# Altium PCB RP2040_Dev_Board.PcbDoc
Units mm, origin at the board's own origin, x right, y up, seen from the top; angles counter-clockwise.
Board outline 25 x 55 mm, 4 copper layers (Top Layer, GND, PWR, Bottom Layer), stack 1.59 mm thick; 41 components, 56 nets, 209 pads, 72 vias.
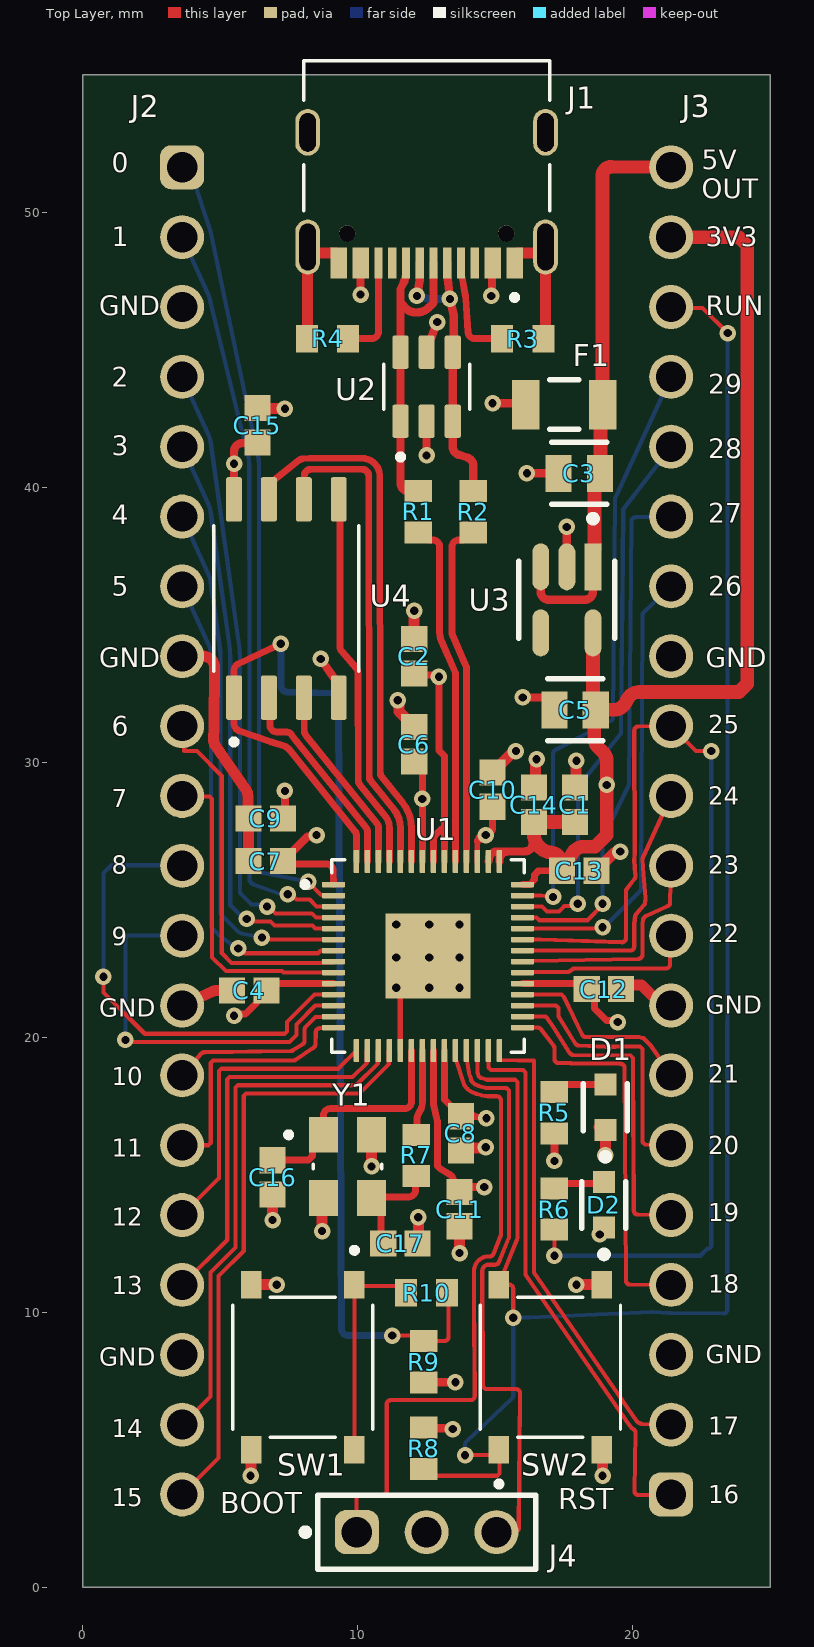
[diagram p0: Top Layer view]
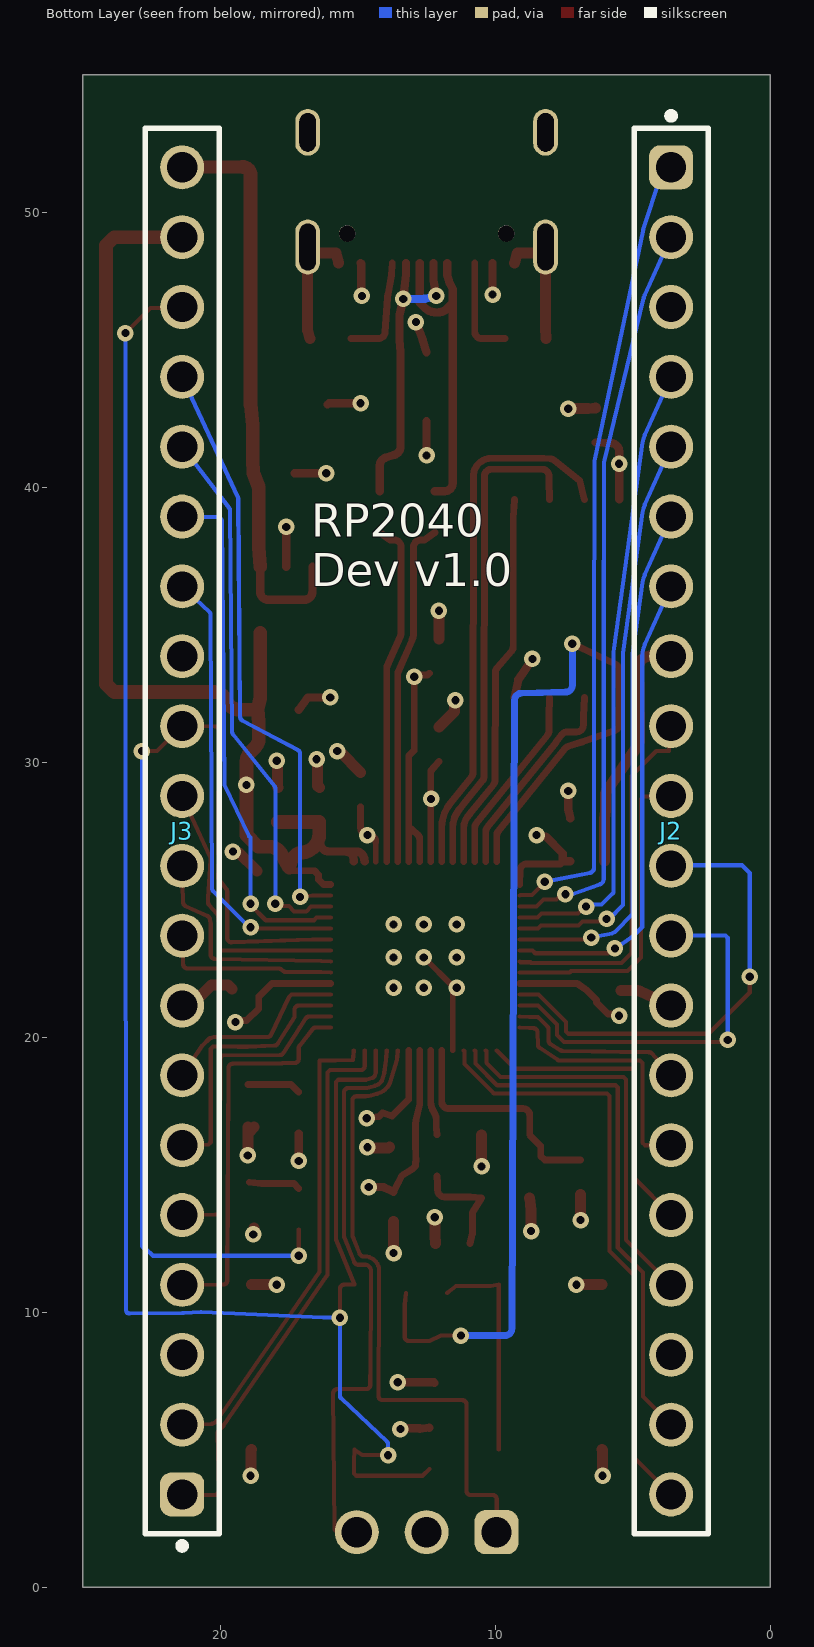
[diagram p1: Bottom Layer view, seen from below]
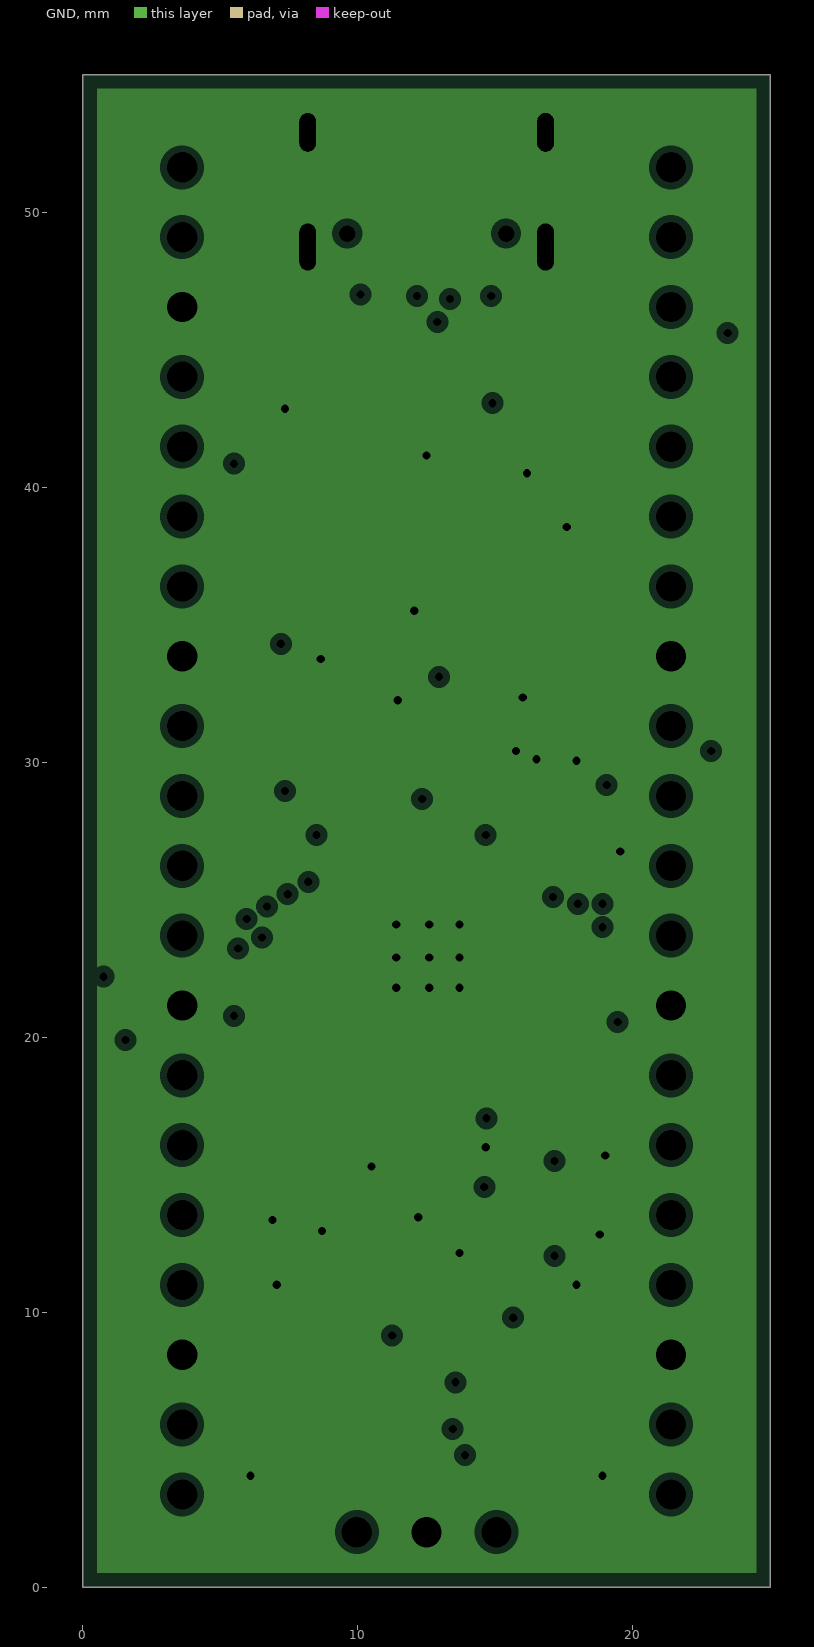
[diagram p2: GND, clearances drawn from the general rule]
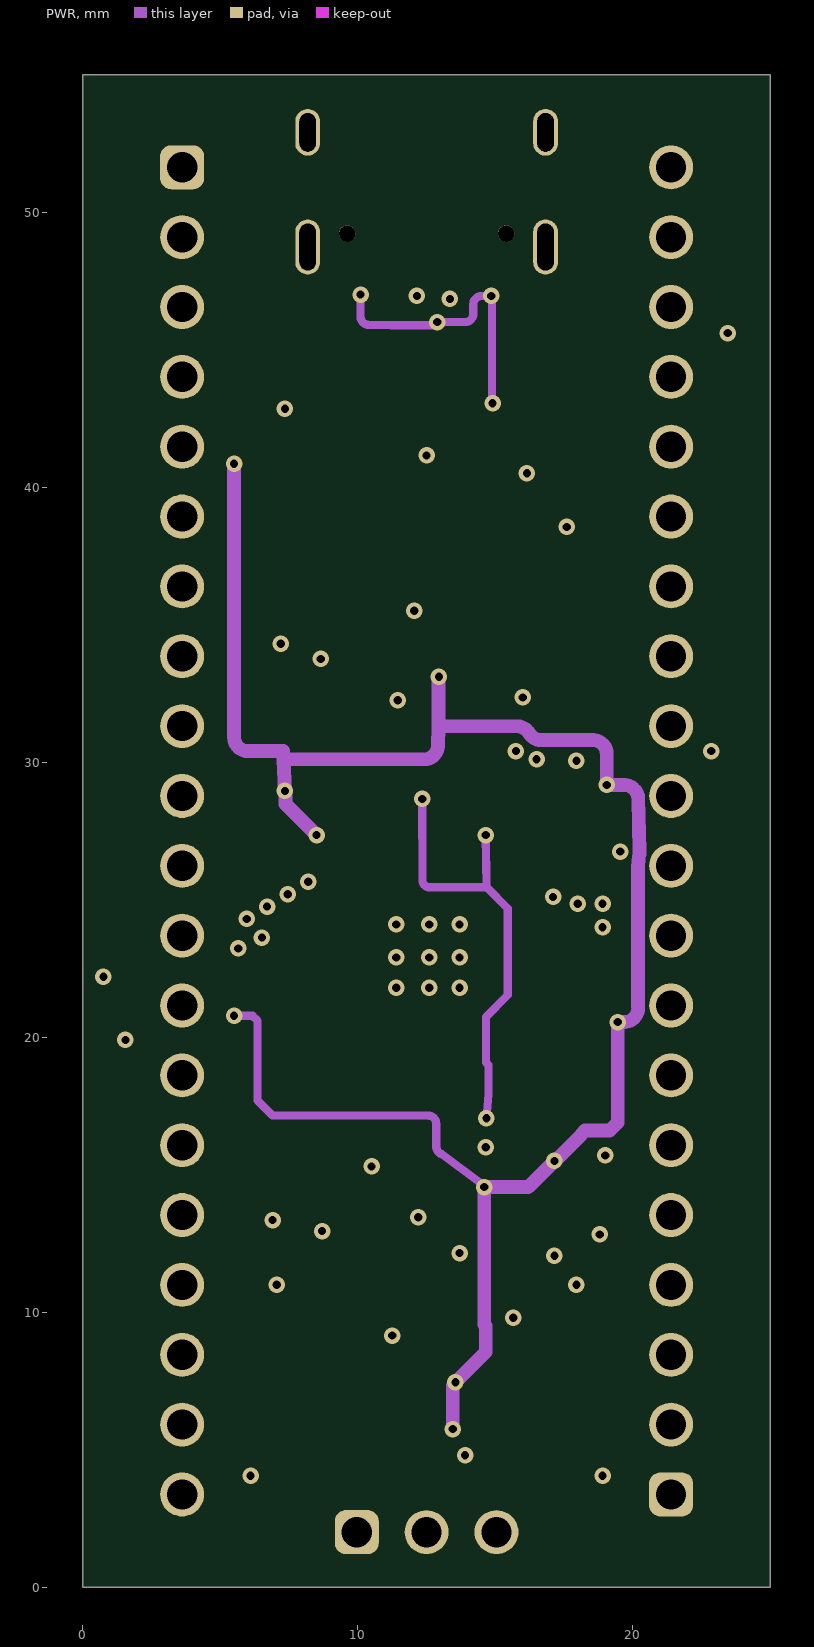
[diagram p3: PWR]
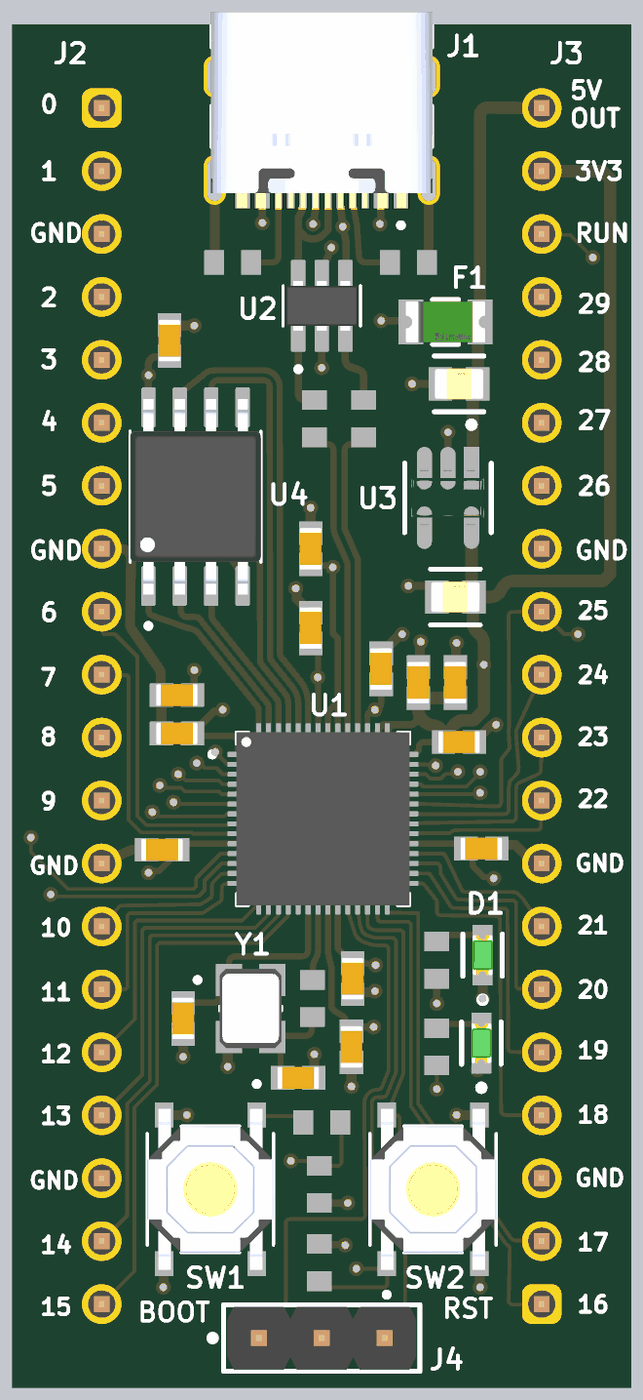
[diagram p4: 3D render of the assembled board from above, using the file's embedded part models]

## Layer stack, top to bottom
Top Solder: solder mask 0.0102, Solder Resist, Dk 3.5
Top Layer: signal copper 0.035
Dielectric 2: prepreg 0.21, PP-006, Dk 4.1
GND: plane copper 0.0175, net GND
Dielectric 1: dielectric 1.065, FR-4, Dk 4.8
PWR: signal copper 0.0175
Dielectric 3: prepreg 0.21, PP-006, Dk 4.1
Bottom Layer: signal copper 0.035
Bottom Solder: solder mask 0.0102, Solder Resist, Dk 3.5

## Board outline
0,0 25,0 25,55 0,55

## Design rules (kind name [scope] priority, off if disabled: settings)
BoardOutlineClearance [OnCopper] p1: gap=0.3 ignorepadtopadclearanceinfootprint=FALSE
Clearance [All] p1: gap=0.15 ignorepadtopadclearanceinfootprint=FALSE
DiffPairsRouting [All] p1: maxlimit=0.3 minlimit=0.15 mostfreqgap=0.2 toplayer_minwidth=0.2 toplayer_maxwidth=0.4 toplayer_prefwidth=0.3 midlayer1_minwidth=0.2 midlayer1_maxwidth=0.4 midlayer1_prefwidth=0.3 bottomlayer_minwidth=0.2 bottomlayer_maxwidth=0.4 bottomlayer_prefwidth=0.3 maxuncoupledlength=12.7
HoleSize [All] p1: absolutevalues=TRUE maxlimit=6.3 minlimit=0.3 maxpercent=80.000 minpercent=20.000
MinimumSolderMaskSliver U1_Sliver [InComponent('U1')] p1: minsoldermaskwidth=0
MinimumSolderMaskSliver [All] p2: minsoldermaskwidth=0.1
PlaneClearance [All] p1: clearance=0.25
PlaneConnect Via_Direct [IsVia] p1: planeconnectstyle=Direct reliefexpansion=0.508 reliefentries=4 reliefconductorwidth=0.254 reliefairgap=0.254
PlaneConnect [All] p2: planeconnectstyle=Relief reliefexpansion=0.508 reliefentries=4 reliefconductorwidth=0.254 reliefairgap=0.254
PolygonConnect U1_Direct [InComponent('U1')] p1: thpad.connectstyle=Direct thpad.reliefconductorwidth=0.254 thpad.reliefentries=4 thpad.polygonreliefangle="90 Angle" thpad.airgapwidth=0.254 smdpad.connectstyle=Direct smdpad.reliefconductorwidth=0.254 smdpad.reliefentries=4 smdpad.polygonreliefangle="90 Angle" smdpad.airgapwidth=0.254 via.connectstyle=Relief via.reliefconductorwidth=0.254 via.reliefentries=4 via.polygonreliefangle="90 Angle" via.airgapwidth=0.254
PolygonConnect [All] p2: connectstyle=Relief reliefconductorwidth=0.25 reliefentries=4 polygonreliefangle="90 Angle" airgapwidth=0.25
RoutingVias [All] p1: holewidth=0.3 width=0.6 viastyle="Through Hole" minholewidth=0.3 minwidth=0.6 maxholewidth=0.3 maxwidth=0.6
SolderMaskExpansion Tented [IsVia] p1: expansion=0 istentingtop=TRUE
SolderMaskExpansion [All] p2: expansion=0 istentingtop=FALSE
SupplyNets "Schematic Supply Nets_4" [InNet('3V3')] p1: voltage=0.000
SupplyNets "Schematic Supply Nets_3" [InNet('VBUS')] p2: voltage=0.000
SupplyNets "Schematic Supply Nets_2" [InNet('GND')] p3: voltage=0.000
SupplyNets "Schematic Supply Nets_1" [InNet('5V')] p4: voltage=0.000
SupplyNets "Schematic Supply Nets" [InNet('1V1')] p5: voltage=0.000
Width Power [InNet('VBUS') Or InNet('5V') Or InNet('3V3')] p1: maxlimit=1.5 minlimit=0.2 preferedwidth=0.5
Width [All] p2: maxlimit=1 minlimit=0.15 preferedwidth=0.25
25 further rules are at their usual default settings.

## Classes and differential pairs
differential pair USB_D: +USB_D_P -USB_D_N
differential pair USB_CONN: +USB_CONN_P -USB_CONN_N

## Components (designator, comment, footprint, x,y, rotation, side; value= is the part's Value field where it differs from the comment)
C1 "100nF" CAPC1608X90X40NL10T20 17.9,28.45 r90 top
C2 "100nF" CAPC1608X90X40NL10T20 12.05,33.85 r90 top
C3 "10uF" FP-C0805C106K4PACTU-MFG 18.05,40.5 r0 top
C4 "100nF" CAPC1608X90X40NL10T20 6.05,21.7 r180 top
C5 "10uF" FP-C0805C106K4PACTU-MFG 17.9,31.9 r0 top
C6 "100nF" CAPC1608X90X40NL10T20 12.05,30.65 r90 top
C7 "100nF" CAPC1608X90X40NL10T20 6.65,26.4 r180 top
C8 "100nF" CAPC1608X90X40NL10T20 13.75,16.5 r270 top
C9 "100nF" CAPC1608X90X40NL10T20 6.65,27.95 r180 top
C10 "1uF" CAPC1608X90X40NL10T20 14.9,29 r90 top
C11 "100nF" CAPC1608X90X40NL10T20 13.7,13.75 r270 top
C12 "100nF" CAPC1608X90X40NL10T20 18.95,21.75 r0 top
C13 "100nF" CAPC1608X90X40NL10T20 18.05,26.05 r0 top
C14 "1uF" CAPC1608X90X40NL10T20 16.4,28.45 r90 top
C15 "100nF" CAPC1608X90X40NL10T20 6.35,42.25 r270 top
C16 "15pF" CAPC1608X90X40NL10T20 6.9,14.9 r90 top
C17 "15pF" CAPC1608X90X40NL10T20 11.55,12.5 r180 top
D1 "KT-0603R" FP-SML-D12-MFG 19,17.45 r90 top
D2 "KT-0603R" FP-SML-D12-MFG 18.95,13.9 r90 top
F1 "1206L050YR" FP-1206L050YR-MFG 17.5,43 r0 top
J1 "TYPE-C-31-M-12" HRO_TYPE-C-31-M-12 12.5,52.9 r180 top locked
J2 "2.54-1*20P" 61302011121 3.61,27.5 r270 bottom locked
J3 "2.54-1*20P" 61302011121 21.39,27.5 r90 bottom locked
J4 "2.54-1*3P" 61300311121 12.5,2 r0 top
R1 "22R" RESC1608X55X25ML10T15 12.2,39.1 r270 top
R2 "22R" RESC1608X55X25ML10T15 14.2,39.1 r270 top
R3 "5.1k" RESC1608X55X25ML10T15 15.999,45.4 r0 top
R4 "5.1k" RESC1608X55X25ML10T15 8.9,45.4 r0 top
R5 "1k" RESC1608X55X25ML10T15 17.15,17.25 r90 top
R6 "1k" RESC1608X55X25ML10T15 17.15,13.75 r90 top
R7 "1k" RESC1608X55X25ML10T15 12.125,15.7 r90 top
R8 "10k" RESC1608X55X25ML10T15 12.4,5.05 r90 top
R9 "10k" RESC1608X55X25ML10T15 12.4,8.2 r90 top
R10 "1k" RESC1608X55X25ML10T15 12.5,10.7 r180 top
SW1 "TS-1187A-B-A-B" SW_TS-1187A-B-A-B 8,8 r270 top
SW2 "TS-1187A-B-A-B" SW_TS-1187A-B-A-B 17,8 r90 top
U1 "RP2040" QFN40P700X700X90-57N 12.55,22.95 r0 top
U2 "USBLC6-2SC6" SOT95P280X145-6N 12.5,43.65 r90 top
U3 "AP2112K-3.3TRG1" FP-SOT25-IPC_A 17.6,35.9 r270 top
U4 "W25Q128JVSIQ" SOIC127P790X216-8N 7.4,35.95 r90 top
Y1 "ABM8-272-T3" XTAL_ABM8-272-T3 9.625,15.3 r0 top

## Footprints (in the part's own frame and the unit in brackets; to place one, negate y for a bottom-side part, rotate by r counter-clockwise, add the part's x,y. Pads: shape width x height; smd on the part's side, far side on the other; paste and mask are expansions set on the pad)
61300311121 [mm] "Pin Header, pitch 2.54 mm, THT, Vertical, single row, 3p"
  rrect50% 1.6x1.6 hole 1.1: 1(-2.54,0)
  round 1.6 hole 1.1: 2(0,0) 3(2.54,0)
  silkscreen extent -4.53,-1.35 3.96,1.35, body extent -3.81,-1.27 3.81,1.27, height 8.57
61302011121 [mm] "Pin Header, pitch 2.54 mm, THT, Vertical, single row, 20p"
  rrect50% 1.6x1.6 hole 1.1: 1(-24.13,0)
  round 1.6 hole 1.1: 2(-21.59,0) 3(-19.05,0) 4(-16.51,0) 5(-13.97,0) 6(-11.43,0) 7(-8.89,0) 8(-6.35,0) 9(-3.81,0) 10(-1.27,0) 11(1.27,0) 12(3.81,0) 13(6.35,0) 14(8.89,0) 15(11.43,0) 16(13.97,0) 17(16.51,0) 18(19.05,0) 19(21.59,0) 20(24.13,0)
  silkscreen extent -26.12,-1.35 25.55,1.35, body extent -25.4,-1.27 25.4,1.27, height 8.57
CAPC1608X90X40NL10T20 [mm] "Chip Capacitor, 2-Leads, Body 1.70x0.90mm, IPC Medium Density"
  rect 0.95x0.95 smd: 1(-0.625,0) 2(0.625,0)
  body extent -0.85,-0.45 0.85,0.45, height 0.9
FP-1206L050YR-MFG [mm]
  rect 1x1.8 smd paste+0 mask+0: 1(-1.4,0) 2(1.4,0)
  silkscreen extent -0.53,-0.9 0.53,0.9, body extent -2,-1 2,1, height 0.25
FP-C0805C106K4PACTU-MFG [mm]
  rect 0.95x1.35 smd paste+0 mask+0: 1(-0.75,0) 2(0.75,0)
  silkscreen extent -1,-1.12 1,1.12, body extent -1.4,-0.85 1.4,0.85, height 0.25
FP-SML-D12-MFG [mm]
  rect 0.8x0.8 smd paste+0 mask+0: 1(-0.825,0) 2(0.825,0)
  silkscreen extent -1.92,-0.8 0.85,0.8, body extent -1.33,-0.55 1.33,0.55, height 0.25
FP-SOT25-IPC_A [mm]
  rect 1.707x0.616 smd paste+0 mask+0: 1(-1.201,0.95)
  rrect100% 1.707x0.616 smd paste+0 mask+0: 2(-1.201,0) 3(-1.201,-0.95) 4(1.201,-0.95) 5(1.201,0.95)
  silkscreen extent -3.08,-1.75 1.4,1.75, body extent -2.55,-2 2.55,2, height 0.25
HRO_TYPE-C-31-M-12 [mm]
  rect 0.6x1.14 smd mask+0.05: A1_B12(-3.2,4.75) A4_B9(-2.4,4.75) B1_A12(3.2,4.75) B4_A9(2.4,4.75)
  rect 0.3x1.14 smd mask+0.05: A5(-1.25,4.75) A6(-0.25,4.75) A7(0.25,4.75) A8(1.25,4.75) B5(1.75,4.75) B6(0.75,4.75) B7(-0.75,4.75) B8(-1.75,4.75)
  oval 0.9x2 hole 0.6 slot 1.7 at 90 deg: S1(-4.325,4.17) S2(4.325,4.17)
  oval 0.9x1.7 hole 0.6 slot 1.4 at 90 deg: S3(-4.325,0) S4(4.325,0)
  round 0.6 hole 0.6 unplated: ""(-2.89,3.68) ""(2.89,3.68)
  silkscreen extent -4.47,-2.6 4.47,6.1, body extent -4.47,-2.6 4.47,5.31, height 3.31
QFN40P700X700X90-57N [mm]
  rrect25% 0.84x0.2 smd: 1(-3.435,2.6) 2(-3.435,2.2) 3(-3.435,1.8) 4(-3.435,1.4) 5(-3.435,1) 6(-3.435,0.6) 7(-3.435,0.2) 8(-3.435,-0.2) 9(-3.435,-0.6) 10(-3.435,-1) 11(-3.435,-1.4) 12(-3.435,-1.8) 13(-3.435,-2.2) 14(-3.435,-2.6) 29(3.435,-2.6) 30(3.435,-2.2) 31(3.435,-1.8) 32(3.435,-1.4) 33(3.435,-1) 34(3.435,-0.6) 35(3.435,-0.2) 36(3.435,0.2) 37(3.435,0.6) 38(3.435,1) 39(3.435,1.4) 40(3.435,1.8) 41(3.435,2.2) 42(3.435,2.6)
  rrect25% 0.2x0.84 smd: 15(-2.6,-3.435) 16(-2.2,-3.435) 17(-1.8,-3.435) 18(-1.4,-3.435) 19(-1,-3.435) 20(-0.6,-3.435) 21(-0.2,-3.435) 22(0.2,-3.435) 23(0.6,-3.435) 24(1,-3.435) 25(1.4,-3.435) 26(1.8,-3.435) 27(2.2,-3.435) 28(2.6,-3.435) 43(2.6,3.435) 44(2.2,3.435) 45(1.8,3.435) 46(1.4,3.435) 47(1,3.435) 48(0.6,3.435) 49(0.2,3.435) 50(-0.2,3.435) 51(-0.6,3.435) 52(-1,3.435) 53(-1.4,3.435) 54(-1.8,3.435) 55(-2.2,3.435) 56(-2.6,3.435)
  rect 3.1x3.1 smd paste-0.57: 57(0,0)
  silkscreen extent -4.57,-3.5 3.5,3.5, body extent -3.5,-3.5 3.5,3.5, height 0.9
RESC1608X55X25ML10T15 [mm] "Chip Resistor, 2-Leads, Body 1.60x0.80mm, IPC Low Density"
  rect 0.8x1 smd: 1(-0.75,0) 2(0.75,0)
  body extent -0.85,-0.45 0.85,0.45, height 0.55
SOIC127P790X216-8N [mm]
  rrect25% 1.61x0.58 smd: 1(-3.605,1.905) 2(-3.605,0.635) 3(-3.605,-0.635) 4(-3.605,-1.905) 5(3.605,-1.905) 6(3.605,-0.635) 7(3.605,0.635) 8(3.605,1.905)
  silkscreen extent -5.31,-2.64 2.64,2.64, body extent -3.95,-2.64 3.95,2.64, height 2.16
SOT95P280X145-6N [mm]
  rrect25% 1.21x0.59 smd: 1(-1.255,0.95) 2(-1.255,0) 3(-1.255,-0.95) 4(1.255,-0.95) 5(1.255,0) 6(1.255,0.95)
  silkscreen extent -2.65,-1.57 0.81,1.57, body extent -1.4,-1.46 1.4,1.46, height 0.4
SW_TS-1187A-B-A-B [mm]
  rect 1x0.75 smd: A(-3,1.875) B(3,1.875) C(-3,-1.875) D(3,-1.875)
  silkscreen extent -4.35,-2.55 2.55,2.55, body extent -3.25,-2.55 3.25,2.55, height 1.55
XTAL_ABM8-272-T3 [mm]
  rect 1.05x1.3 smd: 1(-0.875,1.15) 2(-0.875,-1.15) 3(0.875,-1.15) 4(0.875,1.15)
  silkscreen extent -2.24,-0.09 1.25,1.25, body extent -1.25,-1.6 1.25,1.6, height 0.7

## Part data
C1 C2 C4 C6 C7 C8 C9 C11 C12 C13 C15: library part CMP-001-00017-6, "Chip Capacitor, 100 nF, +/- 10%, 50 V, 0603 (1608 Metric)", Capacitor Type=Ceramic, Case/Package=0603, LCSC=C14663, Max Operating Temperature=125°C, Min Operating Temperature=-55°C, Tolerance=10%, Voltage Rating=50V, Mounting Technology=SM, Pins=2, RoHS Compliant=True
C3 C5: library part CMP-03020-034671-1, "CAP CER 10UF 16V X5R 0805", Case Code (Imperial)=0805, Case Code (Metric)=2012, Dielectric=X5R, Dielectric Material=Ceramic, LCSC=C15850, Max Operating Temperature=85°C, Min Operating Temperature=-55°C, Package Quantity=1, Tolerance=10%, Voltage=16V, Capacitance=10uF, Case/Package=0805, Construction=Flat, Contact Plating=Tin, Depth=1.25mm, Dissipation Factor=5%, Height=1.25mm, Lead Free="Lead Free", Length=2mm, Mount="Surface Mount", Number of Pins=2, Packaging="Tape and Reel", Radiation Hardening=No, REACH SVHC="No SVHC", Series=C, Termination=SMD/SMT, Thickness=0.055inch, Voltage Rating=16V, Voltage Rating (DC)=16V, Width=0.049inch
C10 C14: library part CMP-001-00017-6, "1uF 50V X5R ±10% 0603 Multilayer Ceramic Capacitors MLCC - SMD/SMT ROHS", Capacitor Type=Ceramic, Case/Package=0603, LCSC=C15849, Max Operating Temperature=125°C, Min Operating Temperature=-55°C, Tolerance=10%, Voltage Rating=50V, Mounting Technology=SM, Pins=2, RoHS Compliant=True
C16 C17: library part CMP-001-00017-6, "CAP CER 15pF 50V C0G 0603", Capacitor Type=Ceramic, Case/Package=0603, LCSC=C1644, Max Operating Temperature=125°C, Min Operating Temperature=-55°C, Tolerance=10%, Voltage Rating=50V, Mounting Technology=SM, Pins=2, RoHS Compliant=True
D1 D2: library part CMP-08952-000014-1, "LED RED 1608 SMD", Colour=Red, Forward Current=20mA, Forward Voltage=2.2V, LCSC=C2286, Manufacturer=Rohm, Manufacturer Part Number=SML-D12U8WT86C, Package=SML-D12, Power Dissipation=54mW, Reverse Voltage=5V, Temperature="-40°C to +85°C", Temperature Range High=+85°C, Temperature Range Low=-40°C, Automotive=Yes, Automotive Grade="Grade 3", Category=Diode, ComponentLink2Description=Datasheet, ComponentLink2URL=https://fscdn.rohm.com/en/products/databook/datasheet/opto/led/chip_mono/sml-d12x8(c)-e.pdf, Device Class L1=Optoelectronics, Device Class L2=LEDs, Device Class L3=unset, Digikey Description="LED RED 1608 SMD", Height=0.65mm, Lead Free=Yes, Led Orientation="Top View", Luminous Intensity=63mcd, Mouser Description="LED Uni-Color Red Automotive 2-Pin Chip 0603(1608Metric) T/R", Octopart=https://octopart.com/sml-d12u8wt86c-rohm-77740214, RoHS=TRUE, Wavelength=620nm
F1: library part CMP-08606-000073-1, "PTC RESET FUSE 6V 500MA 1206", Case Code (Imperial)=1206, Case Code (Metric)=3216, Current Rating=100A, Hold Current=500mA, LCSC=C163512, Max Operating Temperature=85°C, Max Power Dissipation=600mW, Max Voltage Rating (DC)=6V, Min Operating Temperature=-40°C, Package Quantity=4000, Resistance=700mR, Trip Current=1A, Approvals=cULus, Case/Package=1206, Height=0.75mm, Lead Free="Lead Free", Length=3.4mm, Max Current Rating=100A, Operating Supply Voltage=6V, Packaging="Tape and Reel", Power Dissipation=600mW, REACH SVHC="No SVHC", RoHS Compliant=Yes, Series=1206L, Terminal Material=Copper, Termination=SMD/SMT, Time to Trip=0.1s, Voltage Rating=6V, Voltage Rating (DC)=6V, Width=1.8mm, Working Voltage=6V
J1: library part CMP-009-000000-1, "USB Connectors 24 Receptacle 1 8.94*7.3mm RoHS", LCSC=C165948, Package=Package, Check_prices=https://www.snapeda.com/parts/TYPE-C-31-M-12/HRO+Electronics+Co.%252C+Ltd./view-part/?ref=eda, Component Type=Standard, Design Item ID=TYPE-C-31-M-12, MF="HRO Electronics Co., Ltd.", MP=TYPE-C-31-M-12, Pin Count=16, SnapEDA_Link=https://www.snapeda.com/parts/TYPE-C-31-M-12/HRO+Electronics+Co.%252C+Ltd./view-part/?ref=snap, Source=TYPE-C-31-M-12.SchLib
J2 J3: library part CMP-1502-01102-4, "THT Vertical Pin Header WR-PHD, Pitch 2.54 mm, Single Row, 20 pins", Color=Black, Contact Resistance=20mΩ, Current Rating=3A, LCSC=C50981, Operating Supply Voltage=250V, Connector Type="Male Pin", Contact Material=Copper, Contact Mating Length=5.9944mm, Contact Plating=Gold, Gender=Male, Lead Pitch=2.54mm, Mount="Through Hole", Number of Contacts=20, Number of Pins=20, Number of Positions=20, Number of Rows=1, Orientation=Vertical, Packaging=Bulk, Pitch=2.54mm, RoHS=Compliant, Termination=Solder
J4: library part CMP-1502-01062-4, "THT Vertical Pin Header WR-PHD, Pitch 2.54 mm, Single Row, 3 pins", Color=Black, Contact Resistance=20mΩ, Current Rating=3A, LCSC=C49257, Max Operating Temperature=105°C, Min Operating Temperature=-40°C, Operating Supply Voltage=250V, Connector Type="Male Pin", Contact Material=Gold, Contact Mating Length=5.9944mm, Contact Plating=Gold, Gender=Male, Height=8.94mm, Lead Free="Lead Free", Lead Pitch=2.54mm, Mount="Through Hole", Number of Contacts=3, Number of Pins=3, Number of Positions=3, Number of Rows=1, Orientation=Vertical, Packaging=Bulk, Pitch=2.54mm, RoHS=Compliant, Termination=Solder, Voltage Rating=250V
R1 R2: library part CMP-2000-04177-1, LCSC=C23345, Manufacturer=Yageo, Part Number=RC0603FR-1020KL
R3 R4: library part CMP-2000-04177-1, LCSC=C23186, Manufacturer=Yageo, Part Number=RC0603FR-1020KL
R5 R6 R7 R10: library part CMP-2000-04177-1, LCSC=C21190, Manufacturer=Yageo, Part Number=RC0603FR-1020KL
R8 R9: library part CMP-2000-04177-1, LCSC=C25804, Manufacturer=Yageo, Part Number=RC0603FR-1020KL
SW1 SW2: library part CMP-011-000000-3, "SPST 50mA @ 12VDC Top Actuated Round Button 160gf SMD Tactile Switches RoHS", LCSC=C318884, Package=None, Availability=Unavailable, Component Type=Standard, Design Item ID=TS-1187A-B-A-B, MP=TS-1187A-B-A-B, Pin Count=4, Price=None, Source=TS-1187A-B-A-B.SchLib
U1: library part CMP-003-000000-1, "RP2040 chip for Raspberry Pi Pico - ARM® Cortex®-M0+ MCU 32-Bit", LCSC=C2040, Package=None, Check_prices=https://www.snapeda.com/parts/RP2040/Raspberry+Pi/view-part/?ref=eda, Component Type=Standard, Design Item ID=RP2040, MF="Raspberry Pi", MP=RP2040, Pin Count=57, SnapEDA_Link=https://www.snapeda.com/parts/RP2040/Raspberry+Pi/view-part/?ref=snap, Source=RP2040.SchLib
U2: library part CMP-004-00031-1, "17V Clamp 5A (8/20Âµs) Ipp Tvs Diode Surface Mount SOT-23-6", Case/Package="SOT-23-6 STMicroelectronics", LCSC=C7519, Availability="In Stock", Check_prices=https://www.snapeda.com/parts/USBLC6-2SC6/STMicroelectronics/view-part/?ref=eda, Component Type=Standard, Design Item ID=USBLC6-2SC6, MF=STMicroelectronics, MP=USBLC6-2SC6, Pins=6, Price=None, Purchase-URL=https://pricing.snapeda.com/search/part/USBLC6-2SC6/?ref=eda, SnapEDA_Link=https://www.snapeda.com/parts/USBLC6-2SC6/STMicroelectronics/view-part/?ref=snap, Source=USBLC6-2SC6.SchLib
U3: library part CMP-12756-000035-1, "IC REG LINEAR 3.3V 600MA SOT25", Case/Package=SOT-23-5, Dropout Voltage=250mV, LCSC=C51118, Max Input Voltage=6V, Max Operating Temperature=85°C, Max Output Current=600mA, Min Input Voltage=2.5V, Min Operating Temperature=-40°C, Output Voltage=3.3V, Package Quantity=1, Quiescent Current=55uA, Accuracy=1.5%, Height=1.3mm, Lead Free="Lead Free", Length=3.1mm, Mount="Surface Mount", Number of Outputs=1, Number of Pins=5, Number of Regulators=1, Output Current=600mA, Output Type=Fixed, Packaging="Tape and Reel", Polarity=Positive, Width=1.7mm
U4: library part CMP-031-00006-1, "FLASH - NOR Memory IC 128Mb (16M x 8) SPI - Quad I/O, QPI, DTR 133 MHz 8-SOIC", Case/Package="SOIC-8 Winbond Electronics", LCSC=C97521, Check_prices=https://www.snapeda.com/parts/W25Q128JVSIQ/Winbond/view-part/?ref=eda, Component Type=Standard, Design Item ID=W25Q128JVSIQ, MF="Winbond Electronics", MP=W25Q128JVSIQ, Pins=8, SnapEDA_Link=https://www.snapeda.com/parts/W25Q128JVSIQ/Winbond/view-part/?ref=snap, Source=W25Q128JVSIQ.SchLib
Y1: library part CMP-003-00030-1, "12 MHz Â±30ppm Crystal 10pF 50 Ohms 4-SMD, No Lead", Case/Package="NON-STANDARD-4 Abracon", LCSC=C20625731, Check_prices=https://www.snapeda.com/parts/ABM8-272-T3/Abracon/view-part/?ref=eda, Component Type=Standard, Design Item ID=ABM8-272-T3, MF=ABRACON, MP=ABM8-272-T3, Pins=4, SnapEDA_Link=https://www.snapeda.com/parts/ABM8-272-T3/Abracon/view-part/?ref=snap, Source=ABM8-272-T3.SchLib

## Via types
v1: diameter 0.6, hole 0.3, Top Layer to Bottom Layer, tented both sides, 72 vias

## Nets (pads, with @x,y where several pads share a name; then routed paths per layer and width w, separated by ;. In a path a pad name is that pad's centre, name@x,y a point inside that pad or via, vN(x,y) a via of type N, cw(c..) or ccw(c..) an arc to the next point about the centre after c; other vN are vias at no path point)
1V1: C6.1 C8.1 C10.1 U1.23 U1.45 U1.50 | length 26.1
  Top Layer w0.2: U1.45 14.35,27.1
  Top Layer w0.25: C6.1 12.35,29.675 12.35,27.617 cw(c10.5,27.612) 12.35,27.612 U1.50 ; U1.23 13.15,17.725 C8.1 14.1,17.25 14.233,17.117 v1(14.675,17.05) ; 14.35,27.1 cw(c14.6,27.1) 14.6,27.35 v1(14.65,27.35) ccw(c14.65,27.6) 14.9,27.6 C10.1
  PWR w0.3: v1(12.339,28.662) 12.349,25.699 ; 12.349,25.698 ccw(c12.599,25.7) 12.599,25.45 14.68,25.45 ; v1(14.65,27.35) 14.68,25.45 ; v1(14.675,17.05) 14.749,17.925 ccw(c14.45,17.95) 14.75,17.95 14.75,18.986 14.655,19.081 14.655,20.736 15.45,21.531 15.45,24.68 14.68,25.45
3V3: C1.1 C2.1 C4.1 C5.2 C7.1 C9.1 C11.1 C12.1 C13.1 C14.1 C15.2 J3.19 R5.1 R8.2 R9.1 U1.1 U1.10 U1.22 U1.33 U1.42 U1.43 U1.44 U1.48 U1.49 U3.5 U4.8 | length 151.9
  Top Layer w0.25: v1(5.5,20.775) 5.567,20.842 5.906,20.842 6.325,21.261 6.325,21.35 C4.1 7.025,21.95 U1.10 ; C7.1@7.625,26.3 8.855,26.3 cw(c8.855,26.05) 9.105,26.055 U1.1 ; C2.1@12.4,33.232 12.465,33.167 12.883,33.167 v1(12.95,33.1) 12.95,30.428 13.15,30.228 13.15,27.65 ; U1.22 12.75,17.559 12.892,16.956 12.899,16.875 ; U1.49 12.75,27.187 cw(c13,27.187) 12.835,27.375 13.15,27.65 ; 12.899,16.874 cw(c12.625,16.85) 12.9,16.85 12.9,16.05 cw(c12.625,16.05) 12.9,16.045 12.894,15.726 12.891,15.533 ccw(c13.141,15.531) 12.891,15.531 12.891,15.473 12.9,15.464 12.9,15.314 13.013,15.201 13.365,14.994 13.416,14.943 13.525,14.725 C11.1 ; U1.48 13.15,27.65 ; U1.33 18.125,21.95 C12.1 18.603,21.472 18.603,21.047 19.048,20.602 19.398,20.602 v1(19.45,20.55) ; U1.42 16.255,25.55 16.429,25.724 16.429,25.904 16.575,26.05 C13.1
  Top Layer w0.3: U4.8 5.499,40.21 5.499,41.301 cw(c5.799,41.3) 5.799,41.6 6.025,41.6 C15.2 ; C7.1 7.55,26.4 7.55,26.675 8.168,27.293 8.443,27.293 v1(8.5,27.35) ; C9.1 7.35,28.275 v1(7.35,28.95) ; R9.1@12.21,7.425 12.235,7.45 v1(13.55,7.45) ; R8.2 12.75,5.75 12.75,5.775 13.425,5.775 v1(13.45,5.75) ; C11.1 14.025,14.525 14.079,14.55 v1(14.6,14.55) ; U1.44 14.766,26.465 ccw(c14.35,26.55) 14.771,26.492 cw(c15.068,26.45) 15.032,26.748 15.05,26.75 15.45,26.75 ; U1.43 15.15,26.45 cw(c15.45,26.45) 15.45,26.75 ; C14.1@16.364,27.5 16.364,27.05 cw(c16.064,27.05) 16.064,26.75 15.45,26.75 ; v1(17.15,15.5) R5.1
  Top Layer w0.5: C1.1 C14.1 16.4,27.4 ccw(c17.089,27.4) 17.015,26.715 cw(c16.96,26.218) 17.385,26.482 cw(c16.699,26.057) 17.498,26.172 17.799,26.679 cw(c18.229,26.424) 17.967,26.85 cw(c18.2,26.525) 18.2,26.925 18.626,26.925 19.05,27.349 v1(19.05,29.168) 19.05,30.025 ccw(c18.55,30.025) 18.883,30.398 ; U3.5 18.55,34.154 18.55,32.325 C5.2 ; 18.882,30.399 18.768,30.501 cw(c19.1,30.875) 18.6,30.875 18.6,31.475 C5.2 ; J3.19 21.394,49.086 23.862,49.086 24.155,48.793 24.155,32.843 23.862,32.55 20.235,32.55 ccw(c20.237,32.05) 19.769,32.226 cw(c19.3,32.4) 19.768,32.225 cw(c19.3,32.4) 19.3,31.9 18.875,31.9 C5.2
  PWR w0.3: v1(5.5,20.775) 6.174,20.775 6.35,20.599 6.35,17.7 6.9,17.15 12.55,17.15 cw(c12.55,16.85) 12.85,16.85 12.85,16.022 ccw(c13.15,16.022) 13.055,15.738 14.424,14.726 v1(14.6,14.55)
  PWR w0.5: v1(5.5,40.85) 5.5,30.9 ccw(c6,30.9) 6,30.4 7.28,30.4 7.295,30.1 ; v1(8.5,27.35) 7.369,28.481 7.369,28.931 v1(7.35,28.95) 7.295,30.1 ; v1(12.95,33.1) 12.931,33.081 12.931,32.054 12.929,32.051 12.929,31.3 ; v1(13.45,5.75) 13.45,7.323 13.55,7.423 v1(13.55,7.45) 14.65,8.55 14.65,9.5 14.6,9.55 v1(14.6,14.55) 16.2,14.55 v1(17.15,15.5) 17.177,15.5 17.923,16.239 18.088,16.404 18.25,16.603 19.157,16.603 19.45,16.896 v1(19.45,20.55) 19.691,20.55 ccw(c19.691,21.05) 20.191,21.058 20.19,21.13 cw(c21.39,21.15) 20.19,21.15 20.19,26.23 cw(c21.39,26.23) 20.201,26.394 20.237,26.654 ccw(c19.544,26.75) 20.244,26.769 20.193,28.68 ccw(c19.693,28.667) 19.696,29.167 19.694,29.167 v1(19.05,29.168) ; v1@19.05,29.3 19.05,30.3 19.05,30.302 ccw(c18.55,30.3) 18.55,30.8 16.66,30.8 cw(c16.66,31.3) 16.227,31.05 ccw(c15.794,30.8) 15.796,31.3 12.929,31.3 ; 7.295,30.1 12.412,30.1 ccw(c12.412,30.6) 12.912,30.587 12.912,30.588 12.929,31.3
5V: C3.2 F1.2 J3.20 U3.1 U3.3 | length 21
  Top Layer w0.3: U3.3 16.65,36.2 ccw(c16.95,36.2) 16.95,35.9 18.25,35.9 ccw(c18.25,36.2) 18.55,36.2 U3.1
  Top Layer w0.5: U3.1 18.602,37.804 18.602,39.975 C3.2 18.821,41.025 18.821,42.25 F1.2 18.9,51.348 cw(c19.2,51.348) 19.202,51.648 J3.20
GND: C1.2 C2.2 C3.1 C4.2 C5.1 C6.2 C7.2 C8.2 C9.2 C10.2 C11.2 C12.2 C13.2 C14.2 C15.1 C16.1 C17.1 D1.1 D2.1 J1.A1_B12 J1.B1_A12 J1.S1 J1.S2 J1.S3 J1.S4 J2.3 J2.8 J2.13 J2.18 J3.3 J3.8 J3.13 J4.2 R3.2 R4.1 SW1.C SW1.D SW2.C SW2.D U1.19 U1.57 U2.2 U3.2 U4.4 Y1.2 Y1.4 | length 52.6
  Top Layer w0.2: U1.19 11.55,21.85 v1(12.6,22.9)
  Top Layer w0.3: v1(8.65,33.75) 9.165,33 U4.4 ; v1(12.5,41.15) U2.2 ; v1(16,32.35) 16.825,32.35 C5.1 ; v1(16.15,40.5) C3.1 ; U3.2 v1(17.6,38.55)
  Top Layer w0.4: J2.13 4.721,21.663 cw(c4.888,21.3) 4.888,21.7 C4.2 ; J2.8 4.394,33.85 cw(c4.394,33.45) 4.794,33.445 4.76,31.292 cw(c3.61,31.31) 4.76,31.291 4.752,30.83 ; 4.752,30.83 ccw(c5.152,30.822) 4.823,30.595 ; 4.823,30.594 5.929,29.003 cw(c5.6,28.775) 6,28.775 6,28.225 C9.2 C7.2 ; v1(6.1,4.05) 6.112,4.062 6.112,4.988 SW1.D ; SW1.C v1(7.05,11) ; C15.1 6.625,42.85 v1(7.35,42.85) ; v1(6.9,13.35) C16.1 ; R4.1 8.175,45.7 J1.S2 8.175,48.52 9.2,48.52 J1.B1_A12 ; v1(8.7,12.95) 8.7,13.7 Y1.2 ; v1(10.5,15.3) Y1.4 ; v1(11.45,32.25) 11.488,32.212 11.488,31.837 C6.2 ; C2.2 v1(12.05,35.5) ; C17.1 12.2,12.775 v1(12.2,13.45) ; v1(13.7,12.15) C11.2@13.7,13.3 ; C8.2@13.85,16 13.888,15.962 14.612,15.962 v1(14.65,16) ; C10.2 15.637,30.362 15.712,30.362 v1(15.75,30.4) ; J1.A1_B12 15.8,48.52 16.825,48.52 J1.S1 16.825,45.7 R3.2 ; C14.2 16.462,29.137 16.462,30.062 v1(16.5,30.1) ; C1.2 17.925,29.1 17.925,30.025 v1(17.95,30.05) ; v1(17.95,11) SW2.D ; C13.2 19.337,26.712 19.506,26.712 v1(19.544,26.75) ; D1.1@18.775,16.725 D1.1@18.962,16.538 ; D2.1@18.784,13.055 18.8,12.855 v1(18.8,12.825) ; SW2.C 18.887,4.988 18.887,4.063 v1(18.9,4.05) ; v1(19,15.7) D1.1@19,16.725 ; C12.2 19.725,21.9 20.315,21.9 21.065,21.15 J3.8
  other v1: 11.4,21.8 12.6,21.8 13.7,21.8 11.4,22.9 13.7,22.9 11.4,24.1 12.6,24.1 13.7,24.1
GPIO0: J2.1 U1.2 | length 29
  Top Layer w0.15: v1(8.2,25.65) 8.2,25.641 8.666,25.175 9.09,25.175 U1.2
  Bottom Layer w0.15: J2.1 4.01,51.23 4.607,49.419 cw(c3.61,49.09) 4.637,49.307 6.381,41.036 cw(c5.5,40.85) 6.4,40.851 6.41,33.85 6.41,26.165 ccw(c6.61,26.165) 6.571,25.968 v1(8.2,25.65)
GPIO1: J2.2 U1.3 | length 27.2
  Top Layer w0.15: v1(7.45,25.2) 7.572,25.2 7.772,25 8.25,25 8.5,24.75 U1.3
  Bottom Layer w0.15: J2.2 4.566,46.984 cw(c3.61,46.55) 4.631,46.796 6.035,40.979 cw(c5.5,40.85) 6.05,40.851 6.06,33.85 6.06,25.747 ccw(c6.26,25.747) 6.198,25.557 ccw(c6.26,25.747) 6.2,25.557 7.302,25.159 7.362,25.159 v1(7.45,25.2)
GPIO2: J2.4 U1.4 | length 22.8
  Top Layer w0.15: v1(6.7,24.75) 6.75,24.75 7,24.5 8.324,24.5 8.474,24.35 U1.4
  Bottom Layer w0.15: J2.4 4.566,41.904 cw(c3.61,41.47) 4.65,41.615 5.69,34.139 cw(c3.61,33.85) 5.71,33.85 5.71,25.251 5.827,25.134 6.134,24.827 6.623,24.827 v1(6.7,24.75)
GPIO3: J2.5 U1.5 | length 21
  Top Layer w0.15: v1(5.958,24.3) 6.044,24.214 6.236,24.214 6.25,24.2 6.826,24.2 6.972,24.053 8.347,24.053 8.45,23.95 U1.5
  Bottom Layer w0.15: J2.5 4.566,39.364 cw(c3.61,38.93) 4.65,39.075 5.343,34.091 cw(c3.61,33.85) 5.36,33.85 5.36,24.8 5.86,24.3 v1(5.958,24.3)
GPIO4: J2.6 U1.6 | length 19.1
  Top Layer w0.15: v1(6.511,23.62) 6.581,23.55 6.85,23.55 U1.6
  Bottom Layer w0.15: J2.6 4.566,36.824 cw(c3.61,36.39) 4.65,36.535 4.997,34.043 cw(c3.61,33.85) 5.01,33.85 5.01,24.47 5.657,23.824 5.761,23.775 v1(6.511,23.62)
GPIO5: J2.7 U1.7 | length 17.5
  Top Layer w0.15: v1(5.65,23.225) 5.725,23.225 5.9,23.05 8.55,23.05 8.65,23.15 U1.7
  Bottom Layer w0.15: J2.7 4.566,34.284 cw(c3.61,33.85) 4.66,33.85 4.66,23.998 4.946,23.712 5.638,23.209 5.65,23.221 v1(5.65,23.225)
GPIO6: J2.9 U1.8 | length 13.4
  Top Layer w0.15: J2.9 3.688,31.232 3.688,30.4 4.15,30.4 5.05,29.5 5.05,23.058 5.408,22.7 8.7,22.7 8.725,22.725 9.09,22.725 U1.8
GPIO7: J2.10 U1.9 | length 11.5
  Top Layer w0.15: J2.10 3.63,28.75 4.612,28.75 4.7,28.662 4.7,22.9 5.2,22.4 7.243,22.4 7.293,22.35 U1.9
GPIO8: J2.11 U1.11 | length 17.1
  Top Layer w0.15: v1(0.75,22.2) 0.75,21.622 2.25,20.122 7.337,20.122 7.425,20.21 7.425,20.549 8.426,21.55 U1.11
  Bottom Layer w0.15: v1(0.75,22.2) 0.75,25.962 1.038,26.25 3.59,26.25 J2.11
GPIO9: J2.12 U1.12 | length 14.2
  Top Layer w0.15: v1(1.55,19.9) 1.628,19.822 7.511,19.822 7.763,20.074 7.763,20.463 8.45,21.15 U1.12
  Bottom Layer w0.15: v1(1.55,19.9) 1.55,23.612 1.638,23.7 3.6,23.7 J2.12
GPIO10: J2.14 U1.13 | length 6.6
  Top Layer w0.15: J2.14 4.306,19.401 cw(c4.419,19.301) 4.416,19.451 7.559,19.499 ccw(c7.556,19.649) 7.635,19.522 7.992,19.743 ccw(c7.913,19.871) 8.063,19.869 ; 8.063,19.87 8.066,20.281 cw(c8.216,20.28) 8.11,20.386 8.419,20.694 cw(c8.524,20.588) 8.524,20.738 8.77,20.738 U1.13
GPIO11: J2.15 U1.14 | length 9.2
  Top Layer w0.15: J2.15 4.562,16.07 4.65,16.158 4.65,19.062 4.738,19.15 7.655,19.15 ccw(c7.655,19.3) 7.738,19.175 8.386,19.607 ccw(c8.303,19.732) 8.453,19.727 8.469,20.181 cw(c8.619,20.176) 8.619,20.326 8.77,20.326 U1.14
GPIO12: J2.16 U1.15 | length 11.1
  Top Layer w0.15: J2.16 4.95,14.87 4.95,18.762 5.038,18.85 9.285,18.85 U1.15
GPIO13: J2.17 U1.16 | length 13.9
  Top Layer w0.15: J2.17 5.25,12.63 5.25,18.462 5.338,18.55 9.809,18.55 10.325,19.066 10.325,19.49 U1.16
GPIO14: J2.19 U1.17 | length 19.1
  Top Layer w0.15: J2.19 4.635,6.935 4.635,11.435 5.55,12.35 5.55,18.162 5.638,18.25 9.933,18.25 10.725,19.042 10.725,19.49 U1.17
GPIO15: J2.20 U1.18 | length 21.7
  Top Layer w0.15: J2.20 4.935,4.695 4.935,11.311 5.85,12.226 5.85,17.862 5.938,17.95 10.057,17.95 11.125,19.018 11.125,19.49 U1.18
GPIO16: J3.1 U1.27 | length 19.9
  Top Layer w0.15: U1.27 14.75,18.95 ccw(c14.9,18.95) 14.9,18.8 16.012,18.8 16.1,18.712 16.1,11.36 16.127,11.321 19.895,5.862 ccw(c20.141,6.034) 19.896,5.86 ccw(c20.264,6.12) 20.027,5.737 ; 20.027,5.737 cw(c19.948,5.609) 20.098,5.607 20.053,3.505 ccw(c20.203,3.502) 20.203,3.352 20.99,3.352 J3.1
GPIO17: J3.2 U1.28 | length 17.1
  Top Layer w0.15: U1.28 15.175,19.17 16.4,19.142 16.4,11.453 20.141,6.034 ccw(c20.264,6.12) 20.203,5.983 20.222,5.974 cw(c20.1,5.7) 20.243,5.964 20.26,5.954 ccw(c20.331,6.087) 20.326,5.937 J3.2
GPIO18: J3.4 U1.29 | length 14.1
  Top Layer w0.15: U1.29 16.527,20.35 cw(c16.527,20.2) 16.645,20.293 17.118,19.691 ; 17.118,19.69 cw(c17,19.598) 17.15,19.598 17.15,19.207 ccw(c17.3,19.207) 17.298,19.057 17.748,19.052 19.553,19.031 cw(c19.552,18.881) 19.702,18.884 19.702,18.883 19.749,11.148 ; 19.749,11.147 ccw(c19.899,11.149) 19.898,10.999 J3.4
GPIO19: J3.5 U1.30 | length 11.8
  Top Layer w0.15: U1.30 16.77,20.75 cw(c16.77,20.6) 16.895,20.683 17.118,20.348 17.707,19.421 ; 17.708,19.42 ccw(c17.834,19.501) 17.832,19.351 19.915,19.328 20.002,19.241 20.002,19.178 20.001,19.032 20.033,13.692 ccw(c20.183,13.694) 20.182,13.544 J3.5
GPIO20: J3.6 U1.31 | length 9.8
  Top Layer w0.15: U1.31 17.15,21.15 cw(c17.15,21) 17.3,21 17.3,20.746 17.908,19.767 ; 17.909,19.767 ccw(c18.036,19.846) 18.029,19.696 19.012,19.65 19.35,19.65 ; J3.6 20.437,16.091 20.35,16.177 20.35,19.571 20.262,19.659 20.198,19.659 19.352,19.65 ; 19.35,19.65 cw(c19.356,19.2) 19.352,19.65 ; 19.35,19.65 19.352,19.65
GPIO21: J3.7 U1.32 | length 7
  Top Layer w0.15: U1.32 17.412,21.55 17.499,21.462 18.159,20.085 ; 18.16,20.084 ccw(c18.294,20.15) 18.294,20 19.086,20 20.233,19.999 20.386,19.959 20.65,19.695 J3.7
GPIO22: J3.9 U1.34 | length 6.5
  Top Layer w0.15: U1.34 16.33,22.369 17.617,22.369 ccw(c17.617,22.519) 17.71,22.402 cw(c17.85,22.225) 17.721,22.409 17.802,22.466 cw(c17.888,22.343) 17.884,22.493 18.171,22.5 cw(c18.173,22.35) 18.172,22.5 21.205,22.5 ccw(c21.205,22.65) 21.355,22.645 J3.9
GPIO23: J3.10 U1.35 | length 8.3
  Top Layer w0.15: U1.35 16.33,22.775 20.203,22.847 ccw(c20.2,22.997) 20.35,22.997 20.35,24.097 cw(c20.5,24.097) 20.351,24.117 20.372,24.272 cw(c20.521,24.252) 20.408,24.352 20.424,24.369 cw(c20.536,24.269) 20.474,24.406 21.264,24.761 ; 21.265,24.762 ccw(c21.203,24.898) 21.353,24.894 J3.10
GPIO24: J3.11 U1.36 | length 10
  Top Layer w0.15: U1.36 16.33,23.144 19.9,23.144 ccw(c19.9,23.294) 20.05,23.294 20.05,24.117 cw(c20.2,24.117) 20.051,24.137 20.087,24.403 cw(c20.235,24.383) 20.123,24.482 20.409,24.803 ccw(c20.296,24.903) 20.446,24.909 ; 20.352,26.463 20.366,26.178 ccw(c21.39,26.23) 20.367,26.166 ccw(c21.39,26.23) 20.368,26.15 20.455,25.067 cw(c20.007,25.029) 20.449,24.943 ccw(c20.596,24.916) 20.446,24.91 ; 20.352,26.464 cw(c20.502,26.471) 20.365,26.533 J3.11
GPIO25: J3.12 R6.1 U1.37 | length 39.6
  Top Layer w0.15: U1.37 16.644,23.55 cw(c16.644,23.4) 16.649,23.55 19.595,23.45 ; v1(17.15,12.05) R6.1 ; 19.596,23.45 ccw(c19.6,23.6) 19.75,23.6 19.75,25.299 cw(c19.9,25.299) 19.781,25.39 20.06,25.754 ; 20.06,25.754 ccw(c19.941,25.845) 20.091,25.857 ; 20.091,25.857 20.069,26.126 cw(c20.368,26.15) 20.069,26.129 cw(c21.39,26.23) 20.067,26.163 20.052,26.449 cw(c20.352,26.464) 20.052,26.452 cw(c20.502,26.471) 20.053,26.502 20.068,26.713 ccw(c19.544,26.75) 20.069,26.752 20.051,31.15 cw(c20.201,31.151) 20.2,31.301 J3.12 22.3,30.4 v1(22.85,30.4)
  Bottom Layer w0.15: v1(17.15,12.05) 22.451,12.05 22.701,12.3 ccw(c22.701,12.45) 22.851,12.449 ; 22.851,12.449 v1@22.851,30.399
GPIO26: J3.14 U1.38 | length 16.4
  Top Layer w0.15: U1.38 18.85,23.95 v1(18.9,24)
  Bottom Layer w0.15: v1(18.9,24) 18.959,24 20.268,25.31 ccw(c20.15,25.402) 20.3,25.401 20.352,35.345 cw(c20.502,35.344) 20.399,35.453 J3.14
GPIO27: J3.15 U1.39 | length 18.9
  Top Layer w0.15: U1.39 16.5,24.35 16.6,24.25 18.35,24.25 18.9,24.8 v1(18.9,24.85)
  Bottom Layer w0.15: v1(18.9,24.85) 18.9,27.254 18.948,27.302 19.856,29.193 19.856,29.226 19.949,38.755 ; 19.949,38.755 cw(c20.099,38.753) 20.095,38.903 J3.15
GPIO28: J3.16 U1.40 | length 20
  Top Layer w0.15: U1.40 16.7,24.75 16.875,24.575 17.317,24.575 17.506,24.764 17.914,24.764 v1(18,24.85)
  Bottom Layer w0.15: v1(18,24.85) 18,29.043 cw(c18.15,29.043) 18.033,29.137 19.541,31.011 ccw(c19.424,31.105) 19.574,31.104 19.65,39.15 cw(c19.8,39.148) 19.68,39.24 J3.16
GPIO29: J3.17 U1.41 | length 21.8
  Top Layer w0.15: U1.41 16.642,25.15 cw(c16.642,25) 16.658,25.149 v1(17.1,25.1)
  Bottom Layer w0.15: v1(17.1,25.1) 17.1,30.306 cw(c17.25,30.306) 17.18,30.439 19.2,31.51 ccw(c19.129,31.642) 19.279,31.641 19.35,39.568 cw(c19.5,39.566) 19.363,39.629 J3.17
NetC17_2: C17.2 R7.1 Y1.3 | length 4
  Top Layer w0.25: C17.2 10.835,12.85 10.835,13.625 Y1.3 10.9,14.192 11.85,14.192 ccw(c11.85,14.442) 12.1,14.442 12.1,14.675 R7.1
NetD1_2: D1.2 R5.2 | length 2
  Top Layer w0.25: R5.2 17.425,18.275 D1.2
NetD2_2: D2.2 R6.2 | length 1.9
  Top Layer w0.25: R6.2 17.328,14.678 18.509,14.678 D2.2@18.95,14.721
NetJ1_A5: J1.A5 R3.1 | length 3.9
  Top Layer w0.25: J1.A5 13.775,47.705 13.897,47.029 ; 13.897,47.028 ccw(c14.143,47.073) 13.902,47.005 cw(c13.35,46.845) 13.924,46.884 14.008,45.633 ; 14.008,45.633 ccw(c14.257,45.65) 14.257,45.4 R3.1
NetJ1_B5: J1.B5 R4.2 | length 3.7
  Top Layer w0.25: R4.2 10.5,45.4 ccw(c10.5,45.65) 10.75,45.65 10.75,47.705 J1.B5
NetR10_2: R10.2 SW1.A SW1.B | length 8
  Top Layer w0.15: SW1.B SW1.A 10.175,10.952 11.425,10.952 R10.2
QSPI_SCLK: U1.52 U4.6 | length 17.9
  Top Layer w0.25: U4.6 8.05,40.235 8.05,40.4 cw(c8.3,40.4) 8.3,40.65 10.147,40.65 cw(c10.147,40.4) 10.397,40.4 10.413,29.481 ccw(c10.663,29.481) 10.469,29.323 11.144,28.486 11.318,28.271 cw(c10.695,27.769) 11.319,28.269 cw(c10.5,27.612) 11.55,27.612 U1.52
QSPI_SD0: U1.53 U4.5 | length 13.8
  Top Layer w0.25: U4.5 9.35,38.875 9.35,34.193 ccw(c9.6,34.193) 9.411,34.03 9.938,33.422 ; 9.939,33.421 cw(c9.749,33.258) 9.999,33.259 10.013,29.339 ccw(c10.263,29.34) 10.068,29.184 10.925,28.12 11.006,28.02 ; 11.007,28.019 cw(c10.5,27.612) 11.15,27.612 U1.53
QSPI_SD1: U1.55 U4.2 | length 7.5
  Top Layer w0.25: U4.2 6.8,31.665 6.8,31.35 ccw(c7.05,31.35) 7.05,31.1 7.385,31.1 cw(c7.385,30.85) 7.583,31.003 7.786,30.741 ccw(c8.3,31.138) 7.792,30.733 ccw(c8.105,30.982) 7.794,30.731 10.295,27.628 cw(c10.1,27.471) 10.35,27.471 U1.55
QSPI_SD2: U1.54 U4.3 | length 6.9
  Top Layer w0.25: U4.3 8.05,31.665 8.05,31.138 ccw(c8.3,31.138) 8.105,30.982 10.695,27.769 cw(c10.5,27.612) 10.75,27.612 U1.54
QSPI_SD3: U1.51 U4.7 | length 19.6
  Top Layer w0.25: U4.7 6.93,40.235 7.857,40.976 cw(c8.013,40.781) 7.996,41.03 8.254,41.048 cw(c8.3,40.4) 8.3,41.05 10.147,41.05 cw(c10.147,40.4) 10.795,40.455 cw(c10.147,40.4) 10.797,40.401 10.813,29.622 ; 10.813,29.621 ccw(c11.063,29.623) 10.867,29.467 11.629,28.522 cw(c10.695,27.769) 11.631,28.52 cw(c10.5,27.612) 11.95,27.612 U1.51
QSPI_SS: R9.2 R10.1 U1.56 U4.1 | length 43.7
  Top Layer w0.15: v1(11.25,9.15) 11.975,9.15 R9.2 13.146,8.95 ccw(c13.146,9.1) 13.296,9.099 13.296,10.275 R10.1
  Top Layer w0.25: v1(7.2,34.3) 5.644,33.568 ccw(c5.75,33.341) 5.5,33.341 5.5,33.025 U4.1 5.5,31.665 5.5,31.38 ccw(c5.75,31.38) 5.667,31.144 6.836,30.736 ccw(c7.05,31.35) 6.852,30.731 7.356,30.57 ; 7.358,30.57 cw(c7.28,30.332) 7.476,30.487 7.478,30.485 ccw(c8.105,30.982) 7.481,30.481 ; 7.482,30.48 9.895,27.486 cw(c9.7,27.33) 9.95,27.33 U1.56
  Bottom Layer w0.25: v1(7.2,34.3) 7.2,32.794 ccw(c7.45,32.794) 7.445,32.544 9.057,32.506 ; 9.058,32.506 cw(c9.051,32.256) 9.301,32.257 9.399,9.399 ; 9.399,9.399 ccw(c9.649,9.4) 9.649,9.15 v1(11.25,9.15)
RUN: J3.18 R8.1 SW2.A SW2.B U1.26 | length 68.2
  Top Layer w0.15: R8.1 12.65,4.05 15.057,4.05 15.145,4.138 15.145,4.575 SW2.A 14.825,4.8 v1(13.9,4.8) ; U1.26 14.35,18.732 ccw(c14.5,18.732) 14.357,18.685 14.382,18.609 ccw(c14.525,18.656) 14.483,18.512 14.68,18.456 ccw(c14.721,18.6) 14.721,18.45 15.712,18.45 15.8,18.362 15.8,12.703 15.789,12.646 SW2.B 15.5,11 cw(c15.5,10.85) 15.65,10.85 v1(15.65,9.8) ; J3.18 21.427,46.513 22.537,46.513 v1(23.45,45.6)
  Bottom Layer w0.15: v1(13.9,4.8) 13.9,5.185 cw(c14.05,5.185) 13.947,5.294 15.603,6.856 ccw(c15.5,6.965) 15.65,6.965 v1(15.65,9.8) 16.247,9.8 ccw(c16.247,9.95) 16.253,9.8 20.695,10 ; 20.696,10 cw(c20.702,9.85) 20.71,10 21.336,9.966 ccw(c21.39,10.99) 21.383,9.965 23.3,9.951 ccw(c23.301,10.101) 23.407,9.995 23.434,10.083 23.447,31.079 23.447,45.597 v1(23.45,45.6)
SWCLK: J4.1 U1.24 | length 23.1
  Top Layer w0.15: J4.1 9.951,2.4 9.951,3.2 cw(c10.101,3.2) 10.101,3.35 10.9,3.35 ccw(c10.9,3.5) 11.05,3.5 11.05,6.65 cw(c11.2,6.65) 11.2,6.8 14.099,6.8 ccw(c14.099,6.95) 14.249,6.951 14.225,10.496 cw(c14.75,10.5) 14.225,10.5 14.225,11.5 cw(c14.75,11.5) 14.225,11.503 cw(c14.75,11.5) 14.75,12.025 14.79,12.025 ccw(c14.79,12.175) 14.929,12.119 15.189,12.763 ccw(c15.05,12.819) 15.2,12.819 15.2,17.7 ccw(c15.05,17.7) 15.05,17.85 14.721,17.85 cw(c14.721,18.6) 14.52,17.877 cw(c14.68,18.456) 14.517,17.878 cw(c14.598,18.167) 14.515,17.879 14.295,17.942 ; U1.24 13.575,19.17 13.838,18.337 ccw(c14.267,18.475) 13.913,18.196 ccw(c14.149,18.381) 13.915,18.193 ccw(c14.267,18.475) 13.919,18.189 ccw(c14.5,18.663) 14.294,17.942
SWDIO: J4.3 U1.25 | length 21.1
  Top Layer w0.15: U1.25 13.975,19.17 14.041,18.699 ccw(c14.189,18.721) 14.046,18.676 14.071,18.595 14.124,18.428 ccw(c14.267,18.475) 14.147,18.385 ccw(c14.267,18.475) 14.149,18.381 ; 14.15,18.38 ccw(c14.5,18.663) 14.377,18.23 14.598,18.167 ccw(c14.68,18.456) 14.601,18.166 ccw(c14.721,18.6) 14.721,18.15 15.35,18.15 cw(c15.35,18) 15.5,18 15.5,12.761 cw(c15.35,12.761) 15.489,12.704 15.132,11.819 cw(c14.993,11.875) 14.993,11.725 14.75,11.725 ccw(c14.75,11.5) 14.525,11.504 ccw(c14.75,11.5) 14.525,11.5 14.525,10.5 ccw(c14.75,10.5) 14.525,10.498 14.543,8.136 14.549,7.349 ; 14.549,7.348 ccw(c14.699,7.35) 14.699,7.2 15.749,7.2 cw(c15.749,7.05) 15.899,7.049 15.851,2.149 ; J4.3 15.701,2 ccw(c15.701,2.15) 15.851,2.148
USB_CONN_N: J1.A7 J1.B7 R2.1 U2.3 U2.4 | length 11.2
  Top Layer w0.3: v1(12.15,46.95) 12.25,47.523 12.25,47.73 J1.A7 ; J1.B7 13.25,47.73 v1(13.35,46.845) 13.487,46.251 13.487,45.36 U2.4 U2.3 13.45,41.466 ccw(c13.75,41.466) 13.655,41.182 13.995,41.068 cw(c13.9,40.784) 14.2,40.784 R2.1
  Bottom Layer w0.3: v1(12.15,46.95) 12.515,46.859 ; 12.516,46.859 ccw(c12.588,47.15) 12.585,46.85 v1(13.35,46.845)
USB_CONN_P: J1.A6 J1.B6 R1.1 U2.1 U2.6 | length 11.7
  Top Layer w0.3: 11.578,46.673 11.79,46.461 ccw(c12.001,46.674) 11.941,46.381 12.028,46.362 ccw(c12.15,46.95) 12.574,46.526 12.655,46.606 12.75,46.701 J1.A6 ; J1.B6 11.75,47.73 11.69,47.503 cw(c11.4,47.58) 11.683,47.48 11.66,47.416 11.55,47.199 11.55,46.701 U2.6 U2.1 11.55,40.15 ccw(c11.85,40.15) 11.85,39.85 R1.1
USB_D_N: R2.2 U1.46 | length 12.6
  Top Layer w0.25: U1.46 13.95,33.45 13.891,33.584 13.446,34.604 cw(c13.675,34.704) 13.425,34.702 13.425,37.826 13.425,37.829 cw(c13.675,37.828) 13.675,38.078 13.825,38.078 R2.2
USB_D_P: R1.2 U1.47 | length 12.6
  Top Layer w0.25: R1.2 12.575,38.078 12.725,38.078 cw(c12.725,37.828) 12.975,37.828 ccw(c13.675,37.828) 12.975,37.826 12.975,34.702 ccw(c13.425,34.702) 12.975,34.696 ccw(c13.675,34.704) 13.034,34.424 13.55,33.242 U1.47
VBUS: F1.1 J1.A4_B9 J1.B4_A9 U2.5 | length 15.1
  Top Layer w0.3: v1(10.1,47) J1.B4_A9 ; U2.5 12.645,45.36 v1(12.887,46.003) ; v1(14.85,46.95) 14.875,46.975 14.875,48.125 J1.A4_B9 ; v1(14.9,43.05) 16.05,43.05 F1.1
  PWR w0.3: v1(10.1,47) 10.1,46.197 ccw(c10.4,46.197) 10.398,45.897 11.212,45.888 12.688,45.888 12.745,45.945 12.829,45.945 v1(12.887,46.003) 13.899,46.001 ; 13.9,46.001 ccw(c13.9,46.301) 14.2,46.301 14.2,46.65 cw(c14.5,46.65) 14.5,46.95 v1(14.85,46.95) 14.875,46.925 14.875,43.075 v1(14.9,43.05)
XIN: C16.2 U1.20 Y1.1 | length 8.5
  Top Layer w0.25: C16.2@6.911,15.536 8.204,15.536 8.35,15.683 8.35,16.05 Y1.1 8.75,17.15 cw(c9,17.15) 9,17.4 11.7,17.4 ccw(c11.7,17.65) 11.95,17.65 U1.20
XOUT: R7.2 U1.21 | length 3.1
  Top Layer w0.25: R7.2 12.15,16.725 12.15,17.04 cw(c12.4,17.04) 12.177,17.153 12.28,17.357 ccw(c11.7,17.65) 12.35,17.65 U1.21
pads on no net: J1. J1.A8 J1.B8 U3.4

## Polygon pours and split planes (outlines as drawn)
GND on GND (split plane): 24.49,0.51 0.51,0.51 0.51,54.49 24.49,54.49

## Silkscreen, mask and mechanical layers (free items; w line width, h text height)
Top Overlay:
  text "0" at 1.05,51.45 h0.7
  text "5V / OUT" at 22.5,50.5 h0.7
  text "1" at 1.05,48.75 h0.7
  text "3V3" at 22.65,48.75 h0.7
  text "GND" at 0.6,46.25 h0.7
  text "RUN" at 22.65,46.25 h0.7
  text "2" at 1.05,43.65 h0.7
  text "29" at 22.75,43.4 h0.7
  text "3" at 1.05,41.15 h0.7
  text "28" at 22.75,41.05 h0.7
  text "27" at 22.75,38.7 h0.7
  text "4" at 1.05,38.65 h0.7
  text "5" at 1.05,36.05 h0.7
  text "26" at 22.75,36.05 h0.7
  text "GND" at 0.6,33.45 h0.7
  text "GND" at 22.65,33.45 h0.7
  text "25" at 22.75,31.05 h0.65
  text "6" at 1.05,30.95 h0.7
  text "24" at 22.75,28.45 h0.65
  text "7" at 1.05,28.35 h0.65
  text "8" at 1.05,25.95 h0.65
  text "23" at 22.75,25.95 h0.65
  text "22" at 22.75,23.45 h0.65
  text "9" at 1.05,23.35 h0.65
  text "GND" at 22.65,20.85 h0.65
  text "GND" at 0.6,20.75 h0.65
  text "21" at 22.75,18.35 h0.65
  text "10" at 1.05,18.25 h0.65
  text "20" at 22.75,15.75 h0.65
  text "11" at 1.05,15.65 h0.65
  text "19" at 22.75,13.3 h0.65
  text "12" at 1.05,13.15 h0.65
  text "18" at 22.75,10.7 h0.65
  text "13" at 1.05,10.65 h0.65
  text "GND" at 22.65,8.15 h0.65
  text "GND" at 0.6,8.05 h0.65
  text "17" at 22.75,5.55 h0.65
  text "14" at 1.05,5.45 h0.65
  text "16" at 22.75,3.05 h0.65
  text "15" at 1.05,2.95 h0.65
  text "RST" at 17.29,2.84 h0.75
  text "BOOT" at 4.99,2.69 h0.75
Bottom Overlay:
  text "RP2040  / Dev v1.0" at 16.7,36.4 h1.2
Mechanical 1:
  the board outline again, w0.254